# Altium PCB Copy of ESP32_HID.PcbDoc
Units mm, origin at the board's own origin, x right, y up, seen from the top; angles counter-clockwise.
Board outline 200 x 80 mm, 2 copper layers (Top Layer, Bottom Layer), stack 1.569 mm thick; 75 components, 79 nets, 356 pads, 0 vias.
Unrouted connection lines stored in the file: 220.
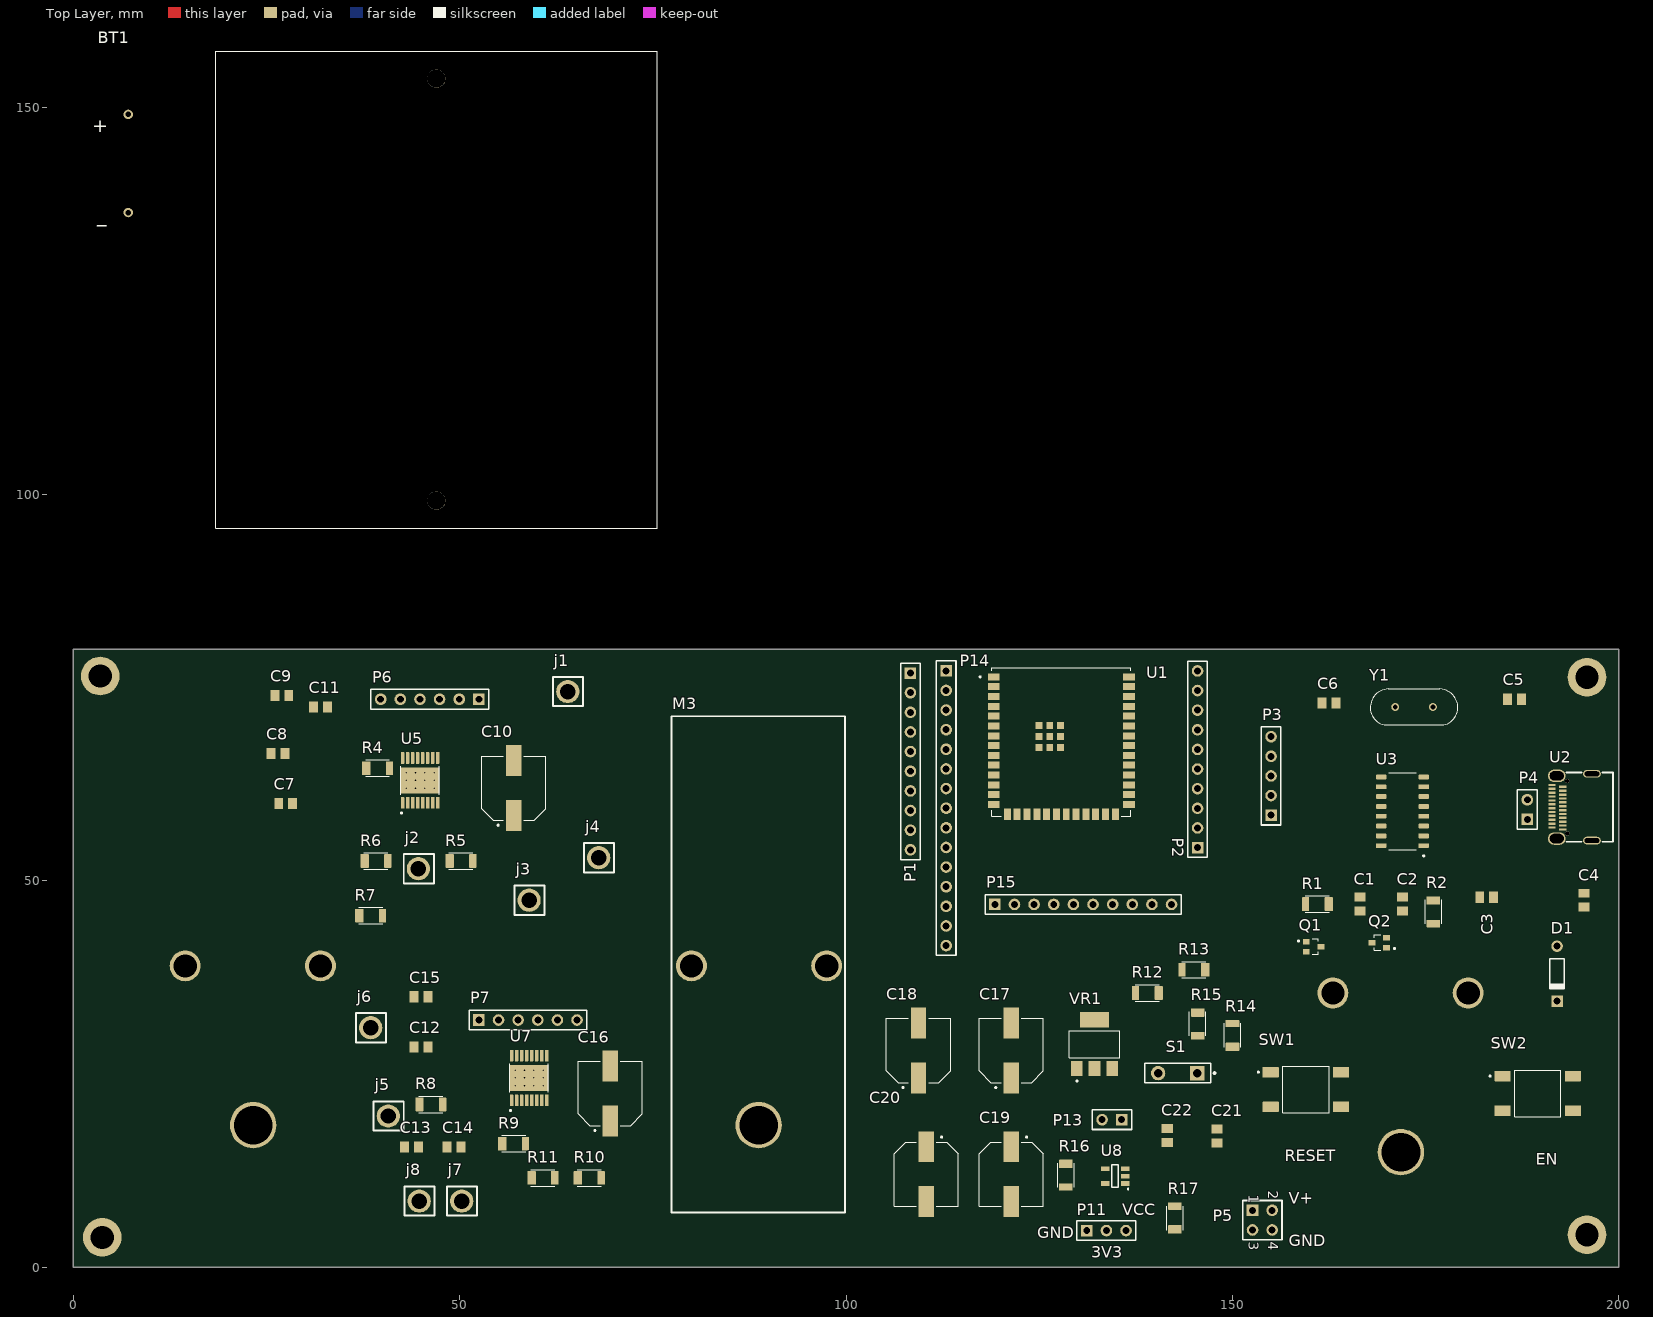
[diagram p0: Top Layer view]
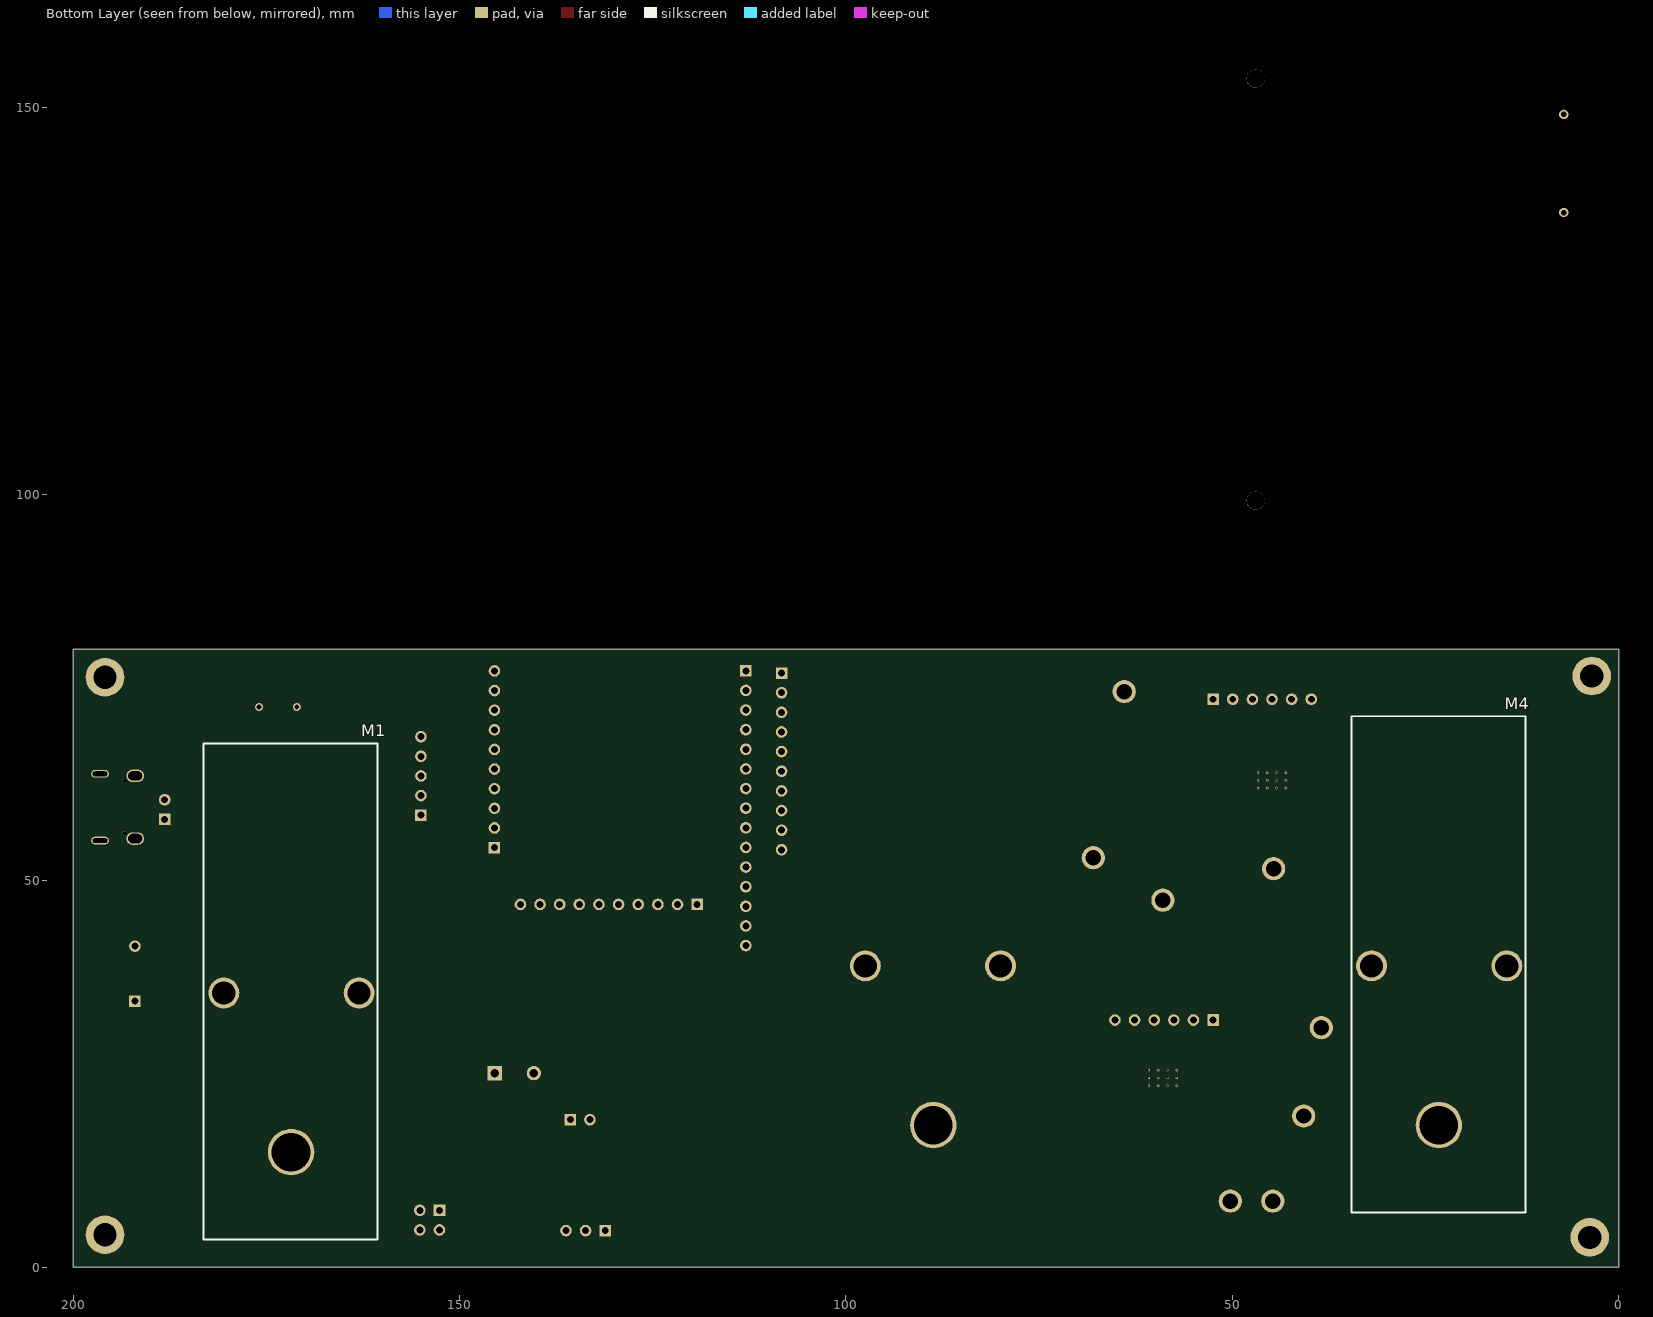
[diagram p1: Bottom Layer view, seen from below]

## Layer stack, top to bottom
Top Solder: solder mask 0.0254, SM-001, Dk 4
Top Layer: signal copper 0.035
Dielectric 1: core 1.4986, Core-043, Dk 4.3
Bottom Layer: signal copper 0.035
Bottom Solder: solder mask 0.0254, SM-001, Dk 4

## Board outline
0,0 200,0 200,80 0,80

## Design rules (kind name [scope] priority, off if disabled: settings)
Clearance [All] p1: gap=0.254 ignorepadtopadclearanceinfootprint=FALSE except(0: Arc-Hole Track-Hole SMDPad-Hole THPad-Hole Via-Hole Fill-Hole Poly-Hole Region-Hole Text-Hole; 0.127: Arc-Arc Arc-Track Arc-SMDPad Track-Track Track-SMDPad SMDPad-SMDPad SMDPad-THPad; 0.2: Arc-THPad Track-THPad)
DiffPairsRouting [All] p1: maxlimit=0.254 minlimit=0.127 mostfreqgap=0.254 toplayer_minwidth=0.254 toplayer_maxwidth=0.381 toplayer_prefwidth=0.381 bottomlayer_minwidth=0.254 bottomlayer_maxwidth=0.381 bottomlayer_prefwidth=0.381 maxuncoupledlength=12.7
MinimumSolderMaskSliver [All] p1: minsoldermaskwidth=0.08
PolygonConnect [All] p1: connectstyle=Relief reliefconductorwidth=0.254 reliefentries=4 polygonreliefangle="90 Angle" airgapwidth=0.254
RoutingVias [All] p1: holewidth=0.2 width=0.5 viastyle="Through Hole" minholewidth=0.15 minwidth=0.2 maxholewidth=0.2 maxwidth=0.5
SolderMaskExpansion [All] p1: expansion=0.102 istentingtop=FALSE
UnRoutedNet [All] p1: checkbadconnections=TRUE
Width "Schematic Width Constraint" [InNetClass('Vm')] p1: maxlimit=1 minlimit=0.354 preferedwidth=0.5
Width Width_1 [All] p2: maxlimit=0.254 minlimit=0.13 preferedwidth=0.254
27 further rules are at their usual default settings.

## Classes and differential pairs
net class Vm: NetC7_1 NetC11_2 NetC12_2 NetC13_1 Netj1_1 Netj2_1 Netj3_1 Netj4_1 Netj5_1 Netj6_1 Netj7_1 Netj8_1 NetR4_1 NetR8_1 NSLEEP NSLEEP_2 VCC
component class "U_DC Motor Control": C7 C8 C9 C10 C11 j1 j2 j3 j4 M3 M4 P6 P10 R4 R5 R6 R7 U5
component class "U_DC Motor Control_2": C12 C13 C14 C15 C16 j5 j6 j7 j8 M1 P7 R8 R9 R10 R11 U7
component class "U_Power Regulation": BT1 C17 C18 C19 C20 C21 C22 P5 P11 P13 R12 R13 R14 R15 R16 R17 S1 U8 VR1
component class U_USB: C1 C2 C3 C4 C5 C6 D1 P3 P4 Q1 Q2 R1 R2 SW1 SW2 U2 U3 Y1
component class U_ESP32_S2_solo: P1 P2 P14 P15 U1
differential pair D: +D_P -D_N

## Components (designator, comment, footprint, x,y, rotation, side; value= is the part's Value field where it differs from the comment)
BT1 "BH4AA-W" BAT_BH4AA-W 47,126.5 r180 top
C1 "0.1uf" CAPC2012X140N 166.5,47 r90 top
C2 "0.1uf" CAPC2012X140N 172,47 r90 top
C3 "0.1uf" CAPC2012X140N 182.9,47.875 r0 top
C4 "0.1uf" CAPC2012X140N 195.5,47.5 r90 top
C5 "33pf" CAPC2012X140N 186.5,73.5 r180 top
C6 "33pf" CAPC2012X140N 162.5,73 r180 top
C7 "LD051A121KAB2A" CAPC2012X140N 27.5,60 r0 top
C8 "LD051A121KAB2A" CAPC2012X140N 26.5,66.5 r0 top
C9 "LD051A121KAB2A" CAPC2012X140N 27,74 r0 top
C10 "EEEHA1V101UP" CAP_EEEHA1V101UP 57,62 r90 top
C11 "LD051A121KAB2A" CAPC2012X140N 32,72.5 r0 top
C12 "LD051A121KAB2A" CAPC2012X140N 45,28.5 r0 top
C13 "LD051A121KAB2A" CAPC2012X140N 43.781,15.579 r0 top
C14 "LD051A121KAB2A" CAPC2012X140N 49.281,15.579 r0 top
C15 "LD051A121KAB2A" CAPC2012X140N 45,35 r0 top
C16 "EEEHA1V101UP" CAP_EEEHA1V101UP 69.5,22.5 r90 top
C17 "EEEHA1V101UP" CAP_EEEHA1V101UP 121.379,28.054 r90 top
C18 "EEEHA1V101UP" CAP_EEEHA1V101UP 109.379,28.054 r90 top
C19 "EEEHA1V101UP" CAP_EEEHA1V101UP 121.379,12.054 r270 top
C20 "EEEHA1V101UP" CAP_EEEHA1V101UP 110.379,12.054 r270 top
C21 "0.1uf" CAPC2012X140N 148,17 r90 top
C22 "0.1uf" CAPC2012X140N 141.575,17.075 r90 top
D1 "Diode 1N4148" DO-35 192,38 r270 top
j1 "Motor" MOTOR_PIN 64,74.5 r0 top
j2 "Motor" MOTOR_PIN 44.681,51.579 r0 top
j3 "Motor" MOTOR_PIN 59,47.5 r0 top
j4 "Motor" MOTOR_PIN 68,53 r0 top
j5 "Motor" MOTOR_PIN 40.781,19.579 r0 top
j6 "Motor" MOTOR_PIN 38.5,31 r0 top
j7 "Motor" MOTOR_PIN 50.281,8.579 r0 top
j8 "Motor" MOTOR_PIN 44.781,8.579 r0 top
M1 "Motor_Mechanical" MOTOR_MECHANICAL 163,35.5 r0 bottom
M3 "Motor_Mechanical" MOTOR_MECHANICAL 97.5,39 r180 top
M4 "Motor_Mechanical" MOTOR_MECHANICAL 14.5,39 r0 bottom
P1 "Header 10" HDR1X10 108.335,76.885 r270 top
P2 "Header 10" HDR1X10 145.485,54.31 r90 top
P3 "Header 5" HDR1X5 155,58.5 r90 top
P4 "Header 2" HDR1X2 188.147,57.959 r90 top
P5 "Header 2X2" HDR2X2 152.6,7.375 r270 top
P6 "Header 6" HDR1X6 52.5,73.5 r180 top
P7 "Header 6" HDR1X6 52.5,32 r0 top
P11 "Header 3" HDR1X3 131.15,4.75 r0 top
P13 "Header 2" HDR1X2 135.675,19.1 r180 top
P14 "Header 15" HDR1X15 112.96,77.185 r270 top
P15 "Header 10" HDR1X10 119.26,46.96 r0 top
Q1 "BC846BW_RF" TRANS_BC846BW_RF 160.5,41.5 r0 top
Q2 "BC846BW_RF" TRANS_BC846BW_RF 169,42 r180 top
R1 "10k" RESC3115X65N 161,47 r180 top
R2 "10k" RESC3115X65N 176,46 r270 top
R4 "1-1879462-4" RESC3115X65N 39.383,64.579 r0 top
R5 "1-1879462-4" RESC3115X65N 50.181,52.579 r0 top
R6 "1-1879462-4" RESC3115X65N 39.181,52.579 r0 top
R7 "1-1879462-4" RESC3115X65N 38.5,45.5 r0 top
R8 "1-1879462-4" RESC3115X65N 46.281,21.079 r0 top
R9 "1-1879462-4" RESC3115X65N 57,16 r0 top
R10 "1-1879462-4" RESC3115X65N 66.781,11.579 r0 top
R11 "1-1879462-4" RESC3115X65N 60.781,11.579 r0 top
R12 "1k" RESC3115X65N 139,35.5 r180 top
R13 "1k" RESC3115X65N 145,38.5 r180 top
R14 "1k" RESC3115X65N 150,30 r90 top
R15 "1k" RESC3115X65N 145.5,31.5 r270 top
R16 "0 ohm" RESC3115X65N 128.45,11.925 r270 top
R17 "1k" RESC3115X65N 142.55,6.375 r90 top
S1 "SW-SPST" SPST-2 142.925,25.125 r180 top
SW1 "FSM4JSMA" TE_FSM4JSMA 159.5,23 r0 top
SW2 "FSM4JSMA" TE_FSM4JSMA 189.5,22.5 r0 top
U1 "ESP32-S2-SOLO-U-N4R2" XCVR_ESP32-S2-SOLO-U-N4R2 127.86,67.985 r0 top
U2 "USB-TYPE-C-FEMAIL" C5156605 195.199,60.423 r90 top
U3 "CH340G" SOIC127P600X180-16N 172,59 r180 top
U5 "DRV8833PWPR" IC_DRV8833PWPR 44.9,63 r90 top
U7 "DRV8833PWPR" IC_DRV8833PWPR 59,24.5 r90 top
U8 "MIC5205-2.5YM5-TR" SOT95P280X145-5N 134.825,11.8 r180 top
VR1 "NCP1117STAT3G" VREG_NCP1117STAT3G 132.15,28.875 r90 top
Y1 "12MHZ" XTAL_ECS-51-S-1 173.5,72.5 r0 top

## Footprints (in the part's own frame and the unit in brackets; to place one, negate y for a bottom-side part, rotate by r counter-clockwise, add the part's x,y. Pads: shape width x height; smd on the part's side, far side on the other; paste and mask are expansions set on the pad)
BAT_BH4AA-W [mm]
  round 1.218 hole 0.71: NEG(39.87,-9.97) POS(39.87,-22.67)
  round 2.36 hole 2.36 unplated: ""(0,27.3) ""(0,-27.3)
  silkscreen extent -28.57,-30.86 28.58,30.86, body extent -180.97,-30.86 28.58,30.86, height 15.88
C5156605 [mm] "USB-C-FMAIL"
  oval 1x2.3 hole 0.6 slot 1.9 at 90 deg: 15(-5.209,-1.318) 16(3.431,-1.318)
  oval 1.6x2.3 hole 1.2 slot 1.8 at 90 deg: 17(3.171,3.232) 18(-4.949,3.232)
  rect 0.3x0.95 smd: A1(-3.514,3.858) A2(-3.014,3.858) A3(-2.514,3.858) A4(-2.014,3.858) A5(-1.514,3.858) A6(-1.014,3.858) A7(-0.514,3.858) A8(-0.014,3.858) A9(0.486,3.858) A10(0.986,3.858) A11(1.486,3.858) A12(1.986,3.858) B1(1.736,2.458) B2(1.236,2.458) B3(0.736,2.458) B4(0.236,2.458) B5(-0.264,2.458) B6(-0.764,2.458) B7(-1.264,2.458) B8(-1.764,2.458) B9(-2.264,2.458) B10(-2.764,2.458) B11(-3.264,2.458) B12(-3.764,2.458)
  round 0.55 hole 0.55 unplated: ""(-4.289,1.882) ""(2.511,1.882)
  silkscreen extent -5.36,-4.02 3.58,2.01
CAP_EEEHA1V101UP [mm]
  rect 4x2 smd: 1(-3.55,0) 2(3.55,0)
  silkscreen extent -4.9,-4.15 4.15,4.15, body extent -4.85,-4.15 4.85,4.15, height 10.2
CAPC2012X140N [mm]
  rect 1.15x1.45 smd: 1(-0.9,0) 2(0.9,0)
  body extent -1,-0.63 1,0.63, height 0.94
DO-35 [mm] "Diode, Axial; Body 3.8 x 1.9 mm (LxDia. max), Lead Dia. 0.53 mm (max)"
  round 1.5 hole 0.9: 1(-3.55,0)
  rect 1.5x1.5 hole 0.9: 2(3.55,0)
  silkscreen extent -1.95,-0.95 2.05,0.95
HDR1X2 [mm] "Connector; Header; 2 Position"
  rect 1.5x1.5 hole 0.9: 1(0,0)
  round 1.5 hole 0.9: 2(2.54,0)
  silkscreen extent -1.27,-1.27 3.81,1.27
HDR1X3 [mm] "Connector; Header; 3 Position"
  rect 1.5x1.5 hole 0.9: 1(0,0)
  round 1.5 hole 0.9: 2(2.54,0) 3(5.08,0)
  silkscreen extent -1.27,-1.27 6.35,1.27
HDR1X5 [mm] "Connector; Header; 5 Position"
  rect 1.5x1.5 hole 0.9: 1(0,0)
  round 1.5 hole 0.9: 2(2.54,0) 3(5.08,0) 4(7.62,0) 5(10.16,0)
  silkscreen extent -1.27,-1.27 11.43,1.27
HDR1X6 [mm] "Connector; Header; 6 Position"
  rect 1.5x1.5 hole 0.9: 1(0,0)
  round 1.5 hole 0.9: 2(2.54,0) 3(5.08,0) 4(7.62,0) 5(10.16,0) 6(12.7,0)
  silkscreen extent -1.27,-1.27 13.97,1.27
HDR1X10 [mm] "Connector; Header; 10 Position"
  rect 1.5x1.5 hole 0.9: 1(0,0)
  round 1.5 hole 0.9: 2(2.54,0) 3(5.08,0) 4(7.62,0) 5(10.16,0) 6(12.7,0) 7(15.24,0) 8(17.78,0) 9(20.32,0) 10(22.86,0)
  silkscreen extent -1.27,-1.27 24.13,1.27
HDR1X15 [mm] "Connector; Header; 15 Position"
  rect 1.5x1.5 hole 0.9: 1(0,0)
  round 1.5 hole 0.9: 2(2.54,0) 3(5.08,0) 4(7.62,0) 5(10.16,0) 6(12.7,0) 7(15.24,0) 8(17.78,0) 9(20.32,0) 10(22.86,0) 11(25.4,0) 12(27.94,0) 13(30.48,0) 14(33.02,0) 15(35.56,0)
  silkscreen extent -1.27,-1.27 36.83,1.27
HDR2X2 [mm] "Connector; Header; 2x2 Position"
  rect 1.5x1.5 hole 0.9: 1(0,0)
  round 1.5 hole 0.9: 2(0,2.54) 3(2.54,0) 4(2.54,2.54)
  silkscreen extent -1.27,-1.27 3.81,3.81
IC_DRV8833PWPR [mm]
  rrect25% 1.5x0.45 smd: 1(-2.9,2.275) 2(-2.9,1.625) 3(-2.9,0.975) 4(-2.9,0.325) 5(-2.9,-0.325) 6(-2.9,-0.975) 7(-2.9,-1.625) 8(-2.9,-2.275) 9(2.9,-2.275) 10(2.9,-1.625) 11(2.9,-0.975) 12(2.9,-0.325) 13(2.9,0.325) 14(2.9,0.975) 15(2.9,1.625) 16(2.9,2.275)
  rect 3.4x5 smd paste-3 mask+0: 17(0,0)
  round 0.3 hole 0.2 mask+0: 18(-1,1.8) 19(0,1.8) 20(1,1.8) 21(-1,0.6) 22(0,0.6) 23(1,0.6) 24(-1,-0.6) 25(0,-0.6) 26(1,-0.6) 27(-1,-1.8) 28(0,-1.8) 29(1,-1.8)
  silkscreen extent -4.3,-2.5 1.83,2.5, body extent -3.2,-2.5 3.2,2.5, height 1.2
MOTOR_MECHANICAL [mm]
  round 4 hole 3: 1(0,0) 1(17.5,0)
  round 6 hole 5: 1(8.8,20.6)
  silkscreen extent -2.4,-32.3 20.1,31.9
MOTOR_PIN [mm]
  round 3 hole 2: 1(0,0)
  silkscreen extent -1.9,-1.9 2,1.9
RESC3115X65N [mm]
  rrect14% 1.09x1.77 smd: 1(-1.465,0)
  rrect14% 0.94x1.77 smd: 2(1.54,0)
  silkscreen extent -1.55,-1.07 1.55,1.06
SOIC127P600X180-16N [mm]
  rrect25% 1.31x0.62 smd: 1(-2.75,4.445) 2(-2.75,3.175) 3(-2.75,1.905) 4(-2.75,0.635) 5(-2.75,-0.635) 6(-2.75,-1.905) 7(-2.75,-3.175) 8(-2.75,-4.445) 9(2.75,-4.445) 10(2.75,-3.175) 11(2.75,-1.905) 12(2.75,-0.635) 13(2.75,0.635) 14(2.75,1.905) 15(2.75,3.175) 16(2.75,4.445)
  silkscreen extent -2.85,-5 1.77,5.85, body extent -3,-5 3,5, height 1.8
SOT95P280X145-5N [mm]
  rect 1.1x0.6 smd: 1(-1.3,0.95) 2(-1.3,0) 3(-1.3,-0.95) 4(1.3,-0.95) 5(1.3,0.95)
  silkscreen extent -1.78,-1.45 0.42,1.77, body extent -1.45,-1.35 1.45,1.35, height 1.45
SPST-2 [mm] "Switch; 2 Leads"
  rect 1.85x1.85 hole 1.1: 1(-2.54,0)
  round 1.85 hole 1.1: 2(2.54,0)
  silkscreen extent -4.89,-1.27 4.28,1.27
TE_FSM4JSMA [mm]
  rrect15% 2.1x1.38 smd: 1(-4.55,2.24) 2(4.55,2.24) 3(-4.55,-2.24) 4(4.55,-2.24)
  silkscreen extent -6.25,-3 3,3, body extent -3,-5 3,5, height 4.98
TRANS_BC846BW_RF [mm]
  rect 0.9x0.7 smd: 1(-0.95,0.65) 2(-0.95,-0.65) 3(0.95,0)
  silkscreen extent -2.07,-1 0.62,1, body extent -1.05,-1 1.05,1, height 1.1
VREG_NCP1117STAT3G [mm]
  rect 2x1.5 smd: 1(-3.15,2.3) 2(-3.15,0) 3(-3.15,-2.3)
  rect 2x3.8 smd: 4(3.15,0)
  silkscreen extent -4.85,-3.25 1.75,3.25, body extent -3.5,-3.25 3.5,3.25, height 1.8
XCVR_ESP32-S2-SOLO-U-N4R2 [mm]
  rect 1.5x0.9 smd: 1(-8.75,8.41) 2(-8.75,7.14) 3(-8.75,5.87) 4(-8.75,4.6) 5(-8.75,3.33) 6(-8.75,2.06) 7(-8.75,0.79) 8(-8.75,-0.48) 9(-8.75,-1.75) 10(-8.75,-3.02) 11(-8.75,-4.29) 12(-8.75,-5.56) 13(-8.75,-6.83) 14(-8.75,-8.1) 27(8.75,-8.1) 28(8.75,-6.83) 29(8.75,-5.56) 30(8.75,-4.29) 31(8.75,-3.02) 32(8.75,-1.75) 33(8.75,-0.48) 34(8.75,0.79) 35(8.75,2.06) 36(8.75,3.33) 37(8.75,4.6) 38(8.75,5.87) 39(8.75,7.14) 40(8.75,8.41)
  rect 0.9x1.5 smd: 15(-6.985,-9.35) 16(-5.715,-9.35) 17(-4.445,-9.35) 18(-3.175,-9.35) 19(-1.905,-9.35) 20(-0.635,-9.35) 21(0.635,-9.35) 22(1.905,-9.35) 23(3.175,-9.35) 24(4.445,-9.35) 25(5.715,-9.35) 26(6.985,-9.35)
  rect 0.9x0.9 smd: 41_1(-2.9,2.09) 41_2(-1.5,2.09) 41_3(-0.1,2.09) 41_4(-2.9,0.69) 41_5(-1.5,0.69) 41_6(-0.1,0.69) 41_7(-2.9,-0.71) 41_8(-1.5,-0.71) 41_9(-0.1,-0.71)
  silkscreen extent -10.6,-9.6 9,9.6
XTAL_ECS-51-S-1 [mm]
  round 1.03 hole 0.63: 1(-2.44,0) 2(2.44,0)
  silkscreen extent -5.68,-2.33 5.68,2.33, body extent -5.47,-2.5 5.88,2.5, height 13.46

## Part data
BT1: "4AA BATTERY HOLDER WITH WIRE LEADS", Package=None, Availability=Unavailable, MF="{'manufacturer': u'MPD'}", MP=BH4AA-W, Price=None
C1 C2 C3 C4 C5 C6 C21 C22: library part LD051A121KAB2A, "120PF 100V 10% 0805", Package=None, Availability=Unavailable, MF="{'manufacturer': u'AVX'}", MP=LD051A121KAB2A, Price=None
C7 C8 C9 C11 C12 C13 C14 C15: "120PF 100V 10% 0805", Package=None, Availability=Unavailable, MF="{'manufacturer': u'AVX'}", MP=LD051A121KAB2A, Price=None
C10 C16 C17 C18 C19 C20 Q1 Q2 U1 U3: Package=None, Availability=Unavailable, Price=None
  C10 C16 C17 C18 C19 C20: MF="{'manufacturer': u'Panasonic'}", MP=EEEHA1V101UP
  Q1 Q2: MF="{'manufacturer': u'Taiwan Semiconductor'}", MP=BC846BW_RF
  U1: MF="{'manufacturer': u'Espressif Systems'}", MP=ESP32-S2-SOLO-U-N4R2
  U3: MF="{'manufacturer': u'WCH'}", MP=CH340G
D1: "High Conductance Fast Diode", Code_JEDEC=DO-204-AH, ComponentLink1Description="Manufacturer Link", ComponentLink1URL=http://www.fairchildsemi.com/, ComponentLink2Description=Datasheet, ComponentLink2URL=http://www.fairchildsemi.com/ds/1N%2F1N4148.pdf, DatasheetVersion=1997, LatestRevisionDate=17-Jul-2002, LatestRevisionNote="Re-released for DXP Platform.", PackageDescription="Diode, Axial; Body 3.8 x 1.9 mm (LxDia. max), Lead Dia. 0.53 mm (max)", PackageReference=DO-35, Published=8-Jun-2000, Publisher="Altium Limited"
P1 P2 P15: "Header, 10-Pin", LatestRevisionDate=17-Jul-2002, LatestRevisionNote="Re-released for DXP Platform.", Publisher="Altium Limited"
P3: "Header, 5-Pin", LatestRevisionDate=17-Jul-2002, LatestRevisionNote="Re-released for DXP Platform.", Publisher="Altium Limited"
P4 P13: "Header, 2-Pin", LatestRevisionDate=17-Jul-2002, LatestRevisionNote="Re-released for DXP Platform.", Publisher="Altium Limited"
P5: "Header, 2-Pin, Dual row", LatestRevisionDate=17-Jul-2002, LatestRevisionNote="Re-released for DXP Platform.", Publisher="Altium Limited"
P6 P7: "Header, 6-Pin", LatestRevisionDate=17-Jul-2002, LatestRevisionNote="Re-released for DXP Platform.", Publisher="Altium Limited"
P11: "Header, 3-Pin", LatestRevisionDate=17-Jul-2002, LatestRevisionNote="Re-released for DXP Platform.", Publisher="Altium Limited"
P14: "Header, 15-Pin", LatestRevisionDate=17-Jul-2002, LatestRevisionNote="Re-released for DXP Platform.", Publisher="Altium Limited"
R1 R2 R12 R13 R14 R15 R16 R17: library part 1-1879462-4, "RL73H 2B R43 1% 10 RL", Package=None, Availability=Unavailable, MF="{'manufacturer': u'TE Connectivity'}", MP=1-1879462-4, Price=None
R4 R5 R6 R7 R8 R9 R10 R11: "RL73H 2B R43 1% 5K RL", Package=None, Availability=Unavailable, MF="{'manufacturer': u'TE Connectivity'}", MP=1-1879462-4, Price=None
S1: "Single-Pole, Single-Throw Switch", LatestRevisionDate=17-Jul-2002, LatestRevisionNote="Re-released for DXP Platform.", PackageDescription="Switch; 2 Leads", PackageReference=SPST-2, Published=24-Mar-1999, Publisher="Altium Limited"
SW1 SW2: "Switch Tactile OFF (ON) SPST Round Button Gull Wing 0.05A 24VDC 2.6N SMD T/R", Package=None, Availability=Unavailable, MF="{'manufacturer': u'TE Connectivity'}", MP=FSM4JSMA, Price=None
U5 U7: "10.8-V, 2-A dual H-bridge motor driver with current regulation 16-HTSSOP -40 to 85", Package=None, Availability=Unavailable, MF="{'manufacturer': u'Texas Instruments'}", MP=DRV8833PWPR, Price=None
U8: "MIC5205 Series 3 V Fixed Output 150 mA SMT Low-Noise LDO Regulator - SOT-23-5", Package=None, Availability=Unavailable, MF="{'manufacturer': u'Microchip Technology'}", MP=MIC5205-2.5YM5-TR, Price=None
VR1: "Linear Voltage Regulator IC 1 Output 1A SOT-223", Package=None, Availability=Unavailable, MF="{'manufacturer': u'ON Semiconductor'}", MP=NCP1117STAT3G, Price=None
Y1: library part ECS-51-S-1, Package=None, Availability=Unavailable, MF="{'manufacturer': u'ECS'}", MP=ECS-51-S-1, Price=None

## Free pads (board coordinates)
  round 5 hole 3: 22(3.5,76.5) 23(195.875,76.35) 24(195.875,4.225) 25(3.775,3.875)

## Nets (pads, with @x,y where several pads share a name; then routed paths per layer and width w, separated by ;. In a path a pad name is that pad's centre, name@x,y a point inside that pad or via, vN(x,y) a via of type N, cw(c..) or ccw(c..) an arc to the next point about the centre after c; other vN are vias at no path point)
3V3: C21.2 C22.2 P1.2 P1.3 P11.2 P13.1 P14.2 U1.2 U8.5
AIN1: P6.3 P14.3 U1.7 U5.16
AIN1_2: P7.3 P15.2 U1.21 U7.16
AIN2: P1.10 P6.4 U1.6 U5.15
AIN2_2: P7.4 P15.1 U1.20 U7.15
BIN1: P1.9 P6.5 U1.5 U5.9
BIN1_2: P7.5 P14.15 U1.19 U7.9
BIN2: P1.8 P6.6 U1.4 U5.10
BIN2_2: P7.6 P14.14 U1.18 U7.10
D_N: P4.2 U2.A7 U2.B7 U3.6
D_P: P4.1 U2.A6 U2.B6 U3.5
DCD: P3.2 U3.12
DTR: Q2.3 R1.1 U3.13
EN: C1.1 P1.7 Q1.3 SW1.1 U1.3
GLCD_CON1: P15.6 U1.25
GLCD_CON2: P15.9 U1.28
GLCD_CON3: P15.10 U1.29
GLCD_CON4: P2.1 U1.30
GLCD_CON5: P2.2 U1.31
GLCD_CON6: P2.3 U1.32
GLCD_CON7: P2.4 U1.33
GLCD_CON8: P2.5 U1.34
GLCD_CON9: P2.6 U1.35
GND: BT1.NEG C1.2 C2.2 C3.1 C4.1 C5.2 C6.2 C7.2 C8.2 C9.2 C10.2 C13.2 C14.2 C15.2 C16.2 C17.2 C18.2 C19.2 C20.2 C21.1 C22.1 P1.4 P1.5 P1.6 P5.3 P5.4 P11.1 P14.1 R6.1 R7.1 R10.1 R11.1 R12.1 R13.2 R15.1 R17.1 SW1.4 SW2.4 U1.1 U1.40 U1.41_1 U1.41_2 U1.41_3 U1.41_4 U1.41_5 U1.41_6 U1.41_7 U1.41_8 U1.41_9 U2.15 U2.16 U2.17 U2.18 U2.A1 U2.A12 U2.B1 U2.B12 U3.1 U5.13 U5.17 U7.13 U7.17 U8.2 VR1.1
IO0: C2.1 P15.8 Q2.2 SW2.1 U1.27
IO1: P2.10 U1.39
IO2: P2.9 U1.38
IO3: P14.11 U1.15
IO16: P14.5 U1.9
IO17: P14.6 U1.10
IO18: P14.7 U1.11
IO19: P14.9 U1.13
IO20: P14.10 U1.14
IO21: P15.4 U1.23
IO33: P15.5 U1.24
IO45: P15.7 U1.26
IO46: P14.12 U1.16
NetC3_2: C3.2 U3.4
NetC5_1: C5.1 U3.7 Y1.2
NetC6_1: C6.1 U3.8 Y1.1
NetC7_1: C7.1 C8.1 C9.1 U5.14
NetC11_2: C11.2 U5.11
NetC12_2: C12.2 U7.11
NetC13_1: C13.1 C14.1 C15.1 U7.14
NetC17_1: C17.1 S1.2 VR1.3
NetC20_1: C20.1 R16.2 U8.4
NetD1_1: D1.1 U2.A4 U2.A9 U2.B4 U2.B9
Netj1_1: j1.1 U5.2
Netj2_1: j2.1 U5.4
Netj3_1: j3.1 U5.7
Netj4_1: j4.1 U5.5
Netj5_1: j5.1 U7.2
Netj6_1: j6.1 U7.4
Netj7_1: j7.1 U7.7
Netj8_1: j8.1 U7.5
NetP3_4: P3.4 U3.10
NetP3_5: P3.5 U3.9
NetP13_2: P13.2 R16.1 R17.2
NetQ1_1: Q1.1 R1.2
NetQ2_1: Q2.1 R2.2
NetR4_1: R4.1 R5.2
NetR6_2: R6.2 U5.3
NetR7_2: R7.2 U5.6
NetR8_1: R8.1 R9.2
NetR10_2: R10.2 U7.3
NetR11_2: R11.2 U7.6
NetR13_1: R13.1 R14.2
NetR14_1: R14.1 R15.2
NFAULT: P6.1 P14.13 U1.17 U5.8
NFAULT_2: P7.1 P14.4 U1.8 U7.8
NSLEEP: P6.2 P14.8 R5.1 U1.12 U5.1
NSLEEP_2: P7.2 P15.3 R9.1 U1.22 U7.1
RI: P3.3 U3.11
RS232: P3.1 U3.15
RST: Q1.2 R2.1 U3.14
UART1: P2.7 U1.36 U3.2
UART2: P2.8 U1.37 U3.3
VCC: BT1.POS C4.2 C10.1 C11.1 C12.1 C16.1 C18.1 C19.1 D1.2 P1.1 P11.3 R4.2 R8.2 R12.2 U3.16 U5.12 U7.12 U8.1 U8.3 VR1.2 VR1.4
VMOT: P5.1 P5.2 S1.1
pads on no net: BT1. M1.1 M3.1 M4.1 SW1.2 SW1.3 SW2.2 SW2.3 U2. U2.A2 U2.A3 U2.A5 U2.A8 U2.A10 U2.A11 U2.B2 U2.B3 U2.B5 U2.B8 U2.B10 U2.B11 U5.18 U5.19 U5.20 U5.21 U5.22 U5.23 U5.24 U5.25 U5.26 U5.27 U5.28 U5.29 U7.18 U7.19 U7.20 U7.21 U7.22 U7.23 U7.24 U7.25 U7.26 U7.27 U7.28 U7.29

## Silkscreen, mask and mechanical layers (free items; w line width, h text height)
Top Overlay:
  text "RESET" at 156.754,13.754 h1.52
  text "EN" at 189.254,13.254 h1.52
  text "V+" at 157.254,8.254 h1.52
  text "VCC" at 135.754,6.754 h1.52
  text "GND" at 124.754,3.754 h1.52
  text "GND" at 157.254,2.754 h1.52
  text "3V3" at 131.754,1.254 h1.52

## Text inside footprints (layer, text, board x,y; h text height)
BT1: Top Overlay "+" at 4.555,148.32 h1.78 r180; Top Overlay "_" at 4.355,134.22 h1.78 r180
P5: Top Overlay "1" at 152.092,9.407 h1.27 r270; Top Overlay "2" at 154.632,9.915 h1.27 r270; Top Overlay "4" at 154.632,3.311 h1.27 r270; Top Overlay "3" at 152.092,3.311 h1.27 r270